# Altium PCB PCB2.pcbdoc (part 3 of 3)
Units mil, origin at the board's own origin, x right, y up, seen from the top; angles counter-clockwise.
Board outline 1771.65 x 2755.61 mil, 4 copper layers (Top Layer, Inner1, Inner2, Bottom Layer), stack 62.447 mil thick; 80 components, 88 nets, 409 pads, 183 vias.
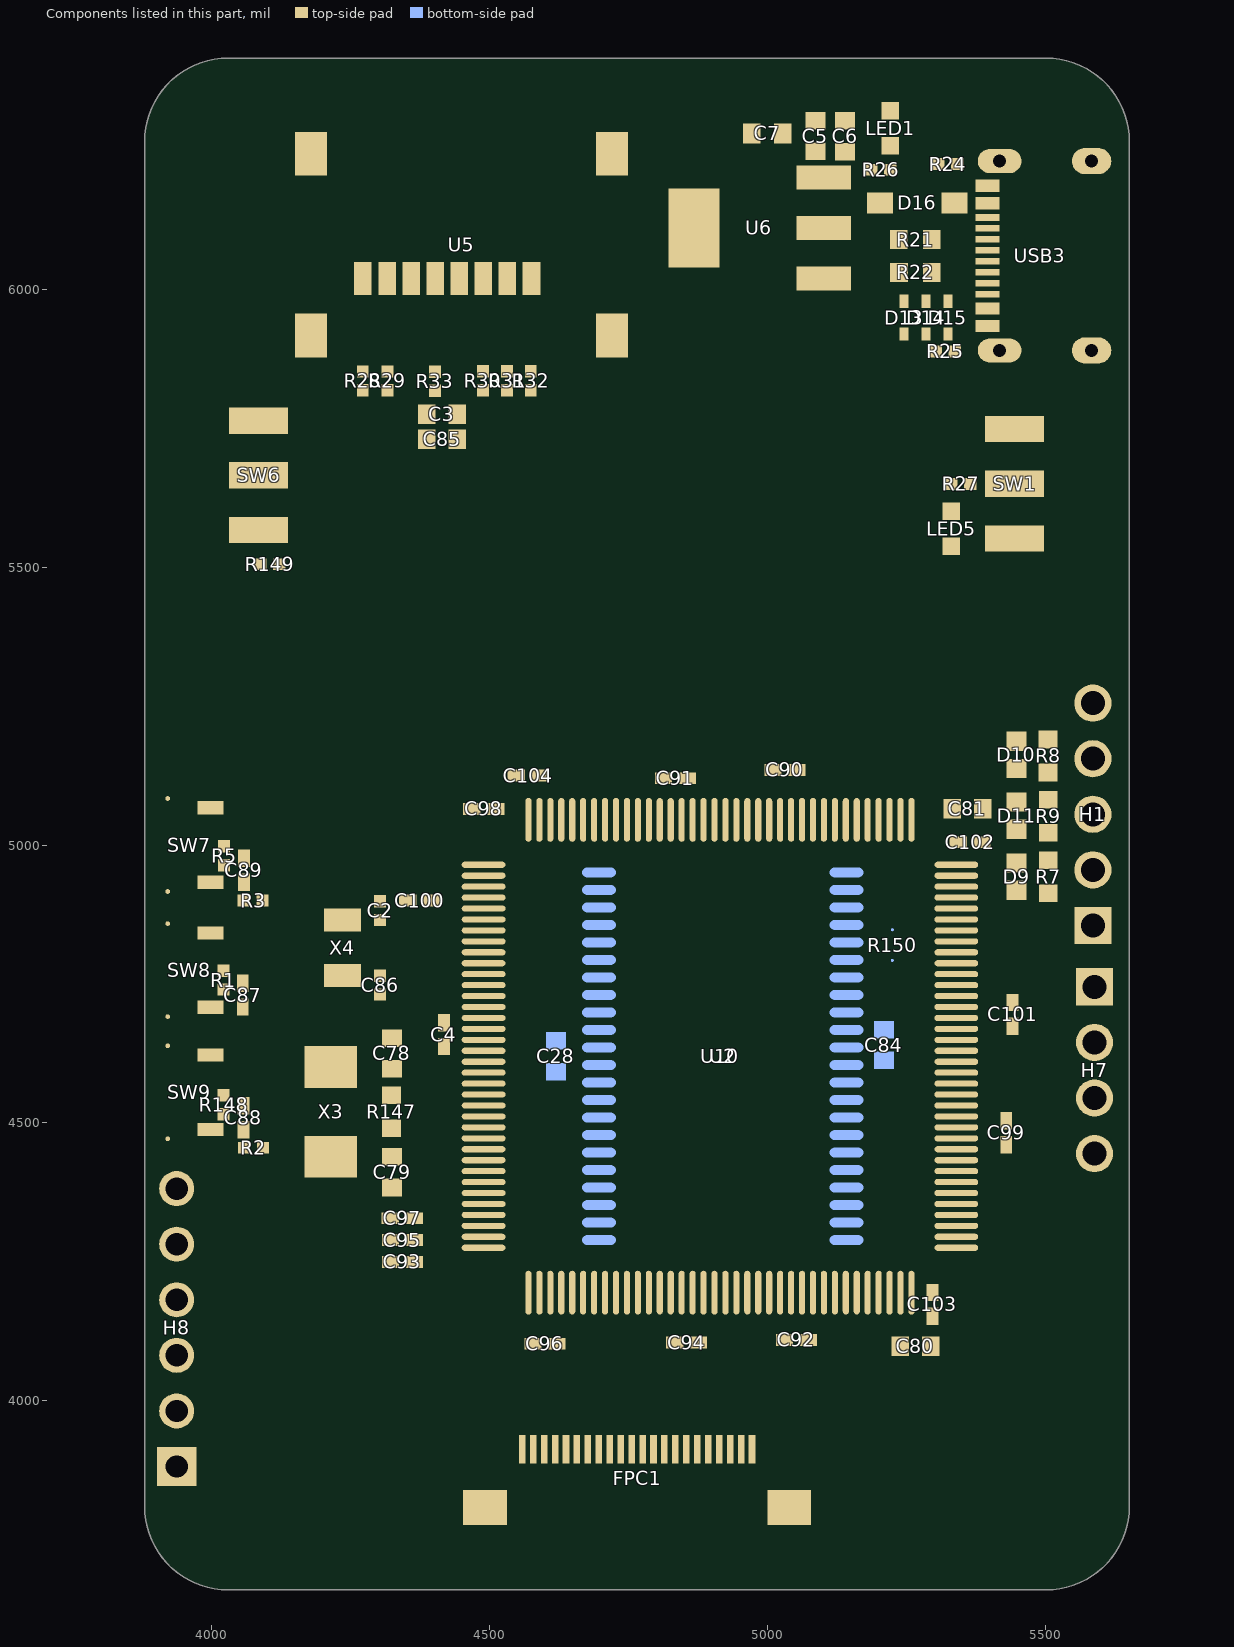
[diagram p5: the components of this part, seen from the top]

## Via types
v1: diameter 24.02, hole 12.01, Top Layer to Bottom Layer, 179 vias
v2: diameter 90.55, hole 82.68, Top Layer to Bottom Layer, 4 vias

## Nets (pads, with @x,y where several pads share a name; then routed paths per layer and width w, separated by ;. In a path a pad name is that pad's centre, name@x,y a point inside that pad or via, vN(x,y) a via of type N, cw(c..) or ccw(c..) an arc to the next point about the centre after c; other vN are vias at no path point) (continued)
pads on no net: H8.1 H8.2 U10.1 U10.2 U10.3 U10.4 U10.5 U10.7 U10.18 U10.19 U10.20 U10.21 U10.22 U10.26 U10.27 U10.28 U10.29 U10.44 U10.45 U10.46 U10.47 U10.48 U10.49 U10.69 U10.70 U10.73 U10.74 U10.75 U10.76 U10.91 U10.92 U10.93 U10.96 U10.97 U10.110 U10.117 U10.122 U10.124 U10.125 U10.126 U10.127 U10.128 U10.129 U10.132 U10.133 U10.134 U10.135 U10.136 U10.137 U10.139 U10.140 USB3.3 USB3.9

## Polygon pours and split planes (outlines as drawn)
NRST on Top Layer (solid, remove dead copper, pour order 6): 4045,4725 4035,4735 4035,4755 4015,4755 3980,4720 3970,4720 3970,4695 4040,4695 4045,4690 4065,4690 4070,4695 4070,4725
$1N25234 on Top Layer (solid, remove dead copper, pour order 8): 4035,4530 4035,4515 4045,4505 4070,4505 4070,4445 4046.71,4445 4016.71,4475 3975,4475 3970,4480 3970,4500 4005,4500 4010,4505 4010,4530
$1N25235 on Top Layer (solid, remove dead copper, pour order 10): 4045.97,4889.03 4015,4920 3975,4920 3970,4925 3970,4940 3975,4945 4005,4945 4010,4950 4010,4975 4035,4975 4035,4960 4045,4950 4070,4950 4070,4889.03
$1N4774 on Top Layer (solid, remove dead copper, pour order 12): 5545,5535 5535,5525 5395,5525 5390,5530 5390,5575 5395,5580 5535,5580 5545,5570
3.3V on Top Layer (solid, remove dead copper, pour order 14): 5300,4990 5300,4960 5305,4955 5375,4955 5385,4965 5385,4970.28 5360.28,4995 5360,4995 5360,5020.14 5330.14,5020.14
$1N4201 on Top Layer (solid, pour order 0): 5328.92,5954.53 5317.05,5966.4 5317.05,5990.07 5317.06,5990.07 5361.11,5990.07 5374.75,5976.43 5427.54,5976.43 5430.42,5973.54 5430.42,5965.98 5418.98,5954.53
5V_USB on Top Layer (solid, pour order 2): 5136.9,6178.59 5052.49,6178.59 5052.49,6252.34 5067.49,6267.35 5158.67,6267.35 5227.04,6198.98 5227.04,6136.5 5226.8,6136.26 5179.23,6136.26
$1N4593 on Top Layer (solid, pour order 4): 4990,6300 4990,6195 5050,6135 5150,6135 5155,6130 5155,6090 5150,6085 4965,6085 4915,6035 4825,6035 4820,6040 4820,6180 4825,6185 4880,6185 4955,6260 4955,6300
3.3V on Top Layer (solid, remove dead copper, pour order 16): 5285,4235 5255,4235 5253.19,4233.19 5253.19,4158.99 5257.15,4155.04 5262.48,4155.04 5285.73,4178.29 5310.09,4178.29 5310.11,4178.31 5310.11,4209.89
3.3V on Top Layer (solid, remove dead copper, pour order 18): 4530,4360 4530,4332.35 4526.42,4328.78 4399.28,4328.78 4382.24,4311.73 4382.24,4238.13 4350.18,4238.13 4348.8,4239.51 4348.8,4340.25 4368.49,4359.94 4482.22,4359.94 4482.28,4360
3.3V on Top Layer (solid, remove dead copper, pour order 20): 4575,5005 4540,5005 4495,5050 4495,5080 4500,5085 4580,5085 4580,5010
5V_USB on Top Layer (solid, remove dead copper, pour order 22): 4825,3890 4830,3885 4980,3885 4985,3890 4985,3935 4980,3940 4830,3940 4825,3935
GND on Top Layer (solid, remove dead copper, pour order 24): 3710,6670 6060,6670 6060,3550 3710,3550
GND on Bottom Layer (solid, remove dead copper, pour order 26): 3595,6825 6195,6825 6195,3000 3595,3000
GND on Inner1 (solid, remove dead copper): 3345,6830 6970,6830 6970,3350 3345,3350
GND on Inner2 (solid, remove dead copper): 3000,6645 7185,6645 7185,3075 3000,3075
5V_USB on Inner2 (solid, remove dead copper): 5145,6240 5195,6240 5210,6225 5210,6180 5205,6175 5145,6175

## Keep-outs
Board Outline Layer:
  the board outline again, w10

## Other copper
Top Layer:
  drawing of 189 lines, arcs and shapes, not listed
Inner1:
  region net 3.3V: 5519.95,4703.19 5519.95,4726.81 ccw(c5519.95,4771.1) 5555.39,4744.53 5555.39,4711.44 ccw(c5555.39,4631.28)
  region net 3.3V: 5536.74,4756.55 5526.8,4799.9 ccw(c5617.53,4890.63) 5555.39,4778.37 5555.39,4725.09 ccw(c5484.59,4704.4)
  region net NRST: 4426.35,4493 4426.35,4487 4424.82,4486.87 4423.6,4486.48 4422.59,4485.89 4421.72,4485.12 4420.05,4483.2 4417.94,4480.99 4417.94,4499.01 4420.05,4496.8 4421.72,4494.88 4422.59,4494.11 4423.6,4493.52 4424.82,4493.13
  region net A2: 4990.3,4860.86 4984.3,4860.86 4984.16,4862.39 4983.78,4863.61 4983.19,4864.62 4982.42,4865.49 4980.5,4867.16 4978.29,4869.27 4996.31,4869.27 4994.1,4867.16 4992.18,4865.49 4991.41,4864.62 4990.82,4863.61 4990.43,4862.39
  region net A1: 4963.19,4834.15 4957.19,4834.15 4957.05,4835.68 4956.67,4836.9 4956.08,4837.91 4955.31,4838.78 4953.39,4840.45 4951.18,4842.56 4969.2,4842.56 4966.99,4840.45 4965.07,4838.78 4964.3,4837.91 4963.71,4836.9 4963.32,4835.68
  region net A0: 4611.35,4793 4611.35,4787 4609.82,4786.87 4608.6,4786.48 4607.59,4785.89 4606.72,4785.12 4605.05,4783.2 4602.94,4780.99 4602.94,4799.01 4605.05,4796.8 4606.72,4794.88 4607.59,4794.11 4608.6,4793.52 4609.82,4793.13
  region net IO7: 5086.8,4460.32 5082.56,4464.56 5083.54,4465.74 5084.14,4466.87 5084.43,4468 5084.51,4469.16 5084.32,4471.7 5084.26,4474.75 5096.99,4462.02 5093.94,4462.08 5091.4,4462.26 5090.24,4462.19 5089.11,4461.9 5087.98,4461.3
  region net IO7: 5077,4300.56 5083,4302.08 5083.14,4300.59 5083.54,4299.35 5084.17,4298.3 5084.97,4297.37 5087,4295.65 5089.32,4293.68 5071.37,4292.15 5072.42,4293.41 5073.44,4294.4 5075.24,4296 5075.96,4296.82 5076.52,4297.78 5076.87,4298.99
  region net NRST: 5458.65,4917 5458.65,4923 5460.18,4923.13 5461.4,4923.52 5462.41,4924.11 5463.28,4924.88 5464.95,4926.8 5467.06,4929.01 5467.06,4910.99 5464.95,4913.2 5463.28,4915.12 5462.41,4915.89 5461.4,4916.48 5460.18,4916.87
  region net 3.3V: 4640.16,4100.88 4623.45,4084.18 4613.13,4094.23 4630.11,4111.21
  region net 3.3V: 4835.59,4053.19 4835.59,4076.81 4850,4077.01 4850,4052.99
  region net 3.3V: 5424.41,4726.81 5424.41,4703.19 5410,4702.99 5410,4727.01
  region net 3.3V: 4376.46,4926.84 4393.16,4943.54 4403.49,4933.49 4386.51,4916.51
  region net 3.3V: 4114.41,4991.81 4114.41,4968.19 4100,4967.99 4100,4992.01
  region net 3.3V: 5338.22,4968.19 5338.22,4991.81 5352.63,4992.01 5352.63,4967.99
  region net 3.3V: 5367.04,4991.81 5367.04,4968.19 5352.63,4967.99 5352.63,4992.01
  region net 3.3V: 5226.84,4918.54 5243.54,4901.84 5233.49,4891.51 5216.51,4908.49
Inner2:
  region net 3.3V: 5542.86,4774.2 5559.56,4790.9 ccw(c5597.14,4841.01) 5597.14,4778.37 5555.39,4736.62 ccw(c5492.75,4736.62)
  region net A18: 4770.9,4448.05 4769.98,4442.05 4768.39,4441.93 4767.18,4441.59 4766.25,4441.07 4765.48,4440.39 4763.92,4438.68 4762.9,4437.72 4761.57,4436.72 4764.15,4454.55 4765.06,4453.34 4765.77,4452.16 4766.96,4450.08 4767.62,4449.25 4768.44,4448.61 4769.5,4448.2
  region net A18: 5378.22,4450.01 5379.28,4456.01 5380.83,4456.14 5382.05,4456.5 5383.03,4457.07 5383.86,4457.8 5385.48,4459.65 5386.46,4460.68 5387.69,4461.76 5386.62,4443.78 5384.61,4446.06 5382.9,4448.06 5381.99,4448.86 5380.95,4449.47 5379.72,4449.87
  region net CS: 4998.68,4985.56 4994.44,4981.32 4993.27,4982.31 4992.13,4982.9 4991,4983.2 4989.84,4983.27 4987.3,4983.08 4984.25,4983.02 4996.98,4995.75 4996.92,4992.7 4996.73,4990.16 4996.8,4989 4997.1,4987.87 4997.69,4986.73
  region net CS: 5213.65,4812.01 5213.65,4817.99 5215.18,4818.13 5216.4,4818.51 5217.41,4819.1 5218.28,4819.87 5219.95,4821.8 5222.06,4824.01 5222.06,4805.99 5219.95,4808.2 5218.28,4810.13 5217.41,4810.9 5216.4,4811.49 5215.18,4811.87
  region net 5V_USB: 5171.81,6175.59 5148.19,6175.59 5147.99,6190 5172.01,6190
  region net 5V_USB: 5009.41,3936.81 5009.41,3913.19 4995,3912.99 4995,3937.01
  region net 3.3V: 5526.81,5635.59 5503.19,5635.59 5502.99,5650 5527.01,5650
Bottom Layer:
  region net $1N4774: 5617.23,4894.99 5625.58,4886.64 ccw(c5650.64,4867.84) 5619.32,4867.84 5598.44,4888.72 ccw(c5598.44,4920.04)
  region net GND: 4646.72,4638.75 4646.72,4632.75 ccw(c4646.72,4589.1) 4637.72,4631.81 4637.72,4643.25 ccw(c4646.72,4650)
  region net 3.3V: 4605.86,4568.34 4593.93,4578.69 ccw(c4560.53,4603.74) 4602.28,4603.74 4630.91,4576.69 ccw(c4630.91,4534.93)
  region net 3.3V: 4646.72,4607.25 4646.72,4601.25 ccw(c4646.72,4590) 4637.72,4596.75 4637.72,4608.19 ccw(c4646.72,4650.9)
  region net 3.3V: 4593.93,4607.37 4607.04,4616.54 ccw(c4632.09,4649.95) 4632.09,4608.19 4602.28,4582.32 ccw(c4560.53,4582.32)
  region net GND: 5183.28,4601.25 5183.28,4607.25 ccw(c5183.28,4618.5) 5192.28,4611.75 5192.28,4596.75 ccw(c5183.28,4590)
  region net GND: 5233.19,4607.25 5233.19,4601.25 ccw(c5233.19,4595.67) 5227.72,4596.75 5227.72,4611.75 ccw(c5233.19,4612.83)
  region net 3.3V: 5196.32,4647.08 5186.06,4645.31 ccw(c5044.31,4787.05) 5192.28,4651.81 5204.31,4651.81 ccw(c5209.57,4633.83)
  region net 3.3V: 5263.15,4679.37 5263.15,4655.75 ccw(c5263.15,4494.33) 5227.72,4651.81 5227.72,4683.31 ccw(c5263.15,4840.79)
  region net 3.3V: 3963.29,4420 3976.76,4400.06 3974.62,4397.58 3972.99,4394.99 3971.76,4392.28 3970.86,4389.45 3970.2,4386.5 3969.67,4383.43 3968.71,4376.92 3938.7,4413.41 3942,4413.35 3945.35,4413.45 3948.68,4413.74 3951.95,4414.28 3955.1,4415.13 3958.08,4416.33 3960.83,4417.93
  region net A4: 5107.31,4947.71 5107.31,4953.71 5108.77,4953.81 5110.01,4954.1 5111.08,4954.54 5112.05,4955.12 5113.97,4956.56 5116.31,4958.21 5116.31,4943.21 5113.97,4944.86 5112.05,4946.3 5111.08,4946.88 5110.01,4947.32 5108.77,4947.61
  region net A3: 5108.25,4916.21 5108.25,4922.21 5109.68,4922.31 5110.8,4922.6 5111.72,4923.04 5112.52,4923.62 5114.12,4925.06 5116.31,4926.71 5116.31,4911.71 5114.12,4913.36 5112.52,4914.8 5111.72,4915.38 5110.8,4915.82 5109.68,4916.11
  region net A1: 5107.31,4853.22 5107.31,4859.22 5108.77,4859.32 5110.01,4859.61 5111.08,4860.05 5112.05,4860.63 5113.97,4862.07 5116.31,4863.72 5116.31,4848.72 5113.97,4850.37 5112.05,4851.81 5111.08,4852.39 5110.01,4852.83 5108.77,4853.12
  region net A0: 5107.31,4821.72 5107.31,4827.72 5108.77,4827.82 5110.01,4828.11 5111.08,4828.55 5112.05,4829.13 5113.97,4830.57 5116.31,4832.22 5116.31,4817.22 5113.97,4818.87 5112.05,4820.31 5111.08,4820.89 5110.01,4821.33 5108.77,4821.62
  region net CS: 5178.01,4796.23 5178.01,4790.23 5176.55,4790.13 5175.31,4789.84 5174.24,4789.4 5173.27,4788.82 5171.35,4787.38 5169.01,4785.73 5169.01,4800.73 5171.35,4799.08 5173.27,4797.64 5174.24,4797.06 5175.31,4796.62 5176.55,4796.33
  region net IO0: 5178.01,4764.73 5178.01,4758.73 5176.55,4758.63 5175.31,4758.34 5174.24,4757.9 5173.27,4757.32 5171.35,4755.88 5169.01,4754.23 5169.01,4769.23 5171.35,4767.58 5173.27,4766.14 5174.24,4765.56 5175.31,4765.12 5176.55,4764.83
  region net IO1: 5178.01,4733.24 5178.01,4727.24 5176.55,4727.14 5175.31,4726.85 5174.24,4726.41 5173.27,4725.83 5171.35,4724.39 5169.01,4722.74 5169.01,4737.74 5171.35,4736.09 5173.27,4734.65 5174.24,4734.07 5175.31,4733.63 5176.55,4733.34
  region net IO2: 5178.01,4701.74 5178.01,4695.74 5176.55,4695.64 5175.31,4695.35 5174.24,4694.91 5173.27,4694.33 5171.35,4692.89 5169.01,4691.24 5169.01,4706.24 5171.35,4704.59 5173.27,4703.15 5174.24,4702.57 5175.31,4702.13 5176.55,4701.84
  region net IO3: 5107.31,4664.24 5107.31,4670.24 5108.77,4670.34 5110.01,4670.63 5111.08,4671.07 5112.05,4671.65 5113.97,4673.09 5116.31,4674.74 5116.31,4659.74 5113.97,4661.39 5112.05,4662.83 5111.08,4663.41 5110.01,4663.85 5108.77,4664.14
  region net 3.3V: 5178.01,4638.75 5178.01,4632.75 5176.55,4632.65 5175.31,4632.36 5174.24,4631.92 5173.27,4631.34 5171.35,4629.9 5169.01,4628.25 5169.01,4643.25 5171.35,4641.6 5173.27,4640.16 5174.24,4639.58 5175.31,4639.14 5176.55,4638.85
  region net GND: 5178.01,4607.25 5178.01,4601.25 5176.55,4601.15 5175.31,4600.86 5174.24,4600.42 5173.27,4599.84 5171.35,4598.4 5169.01,4596.75 5169.01,4611.75 5171.35,4610.1 5173.27,4608.66 5174.24,4608.08 5175.31,4607.64 5176.55,4607.35
  region net IO4: 5108.39,4568.54 5106.31,4574.54 5107.7,4574.65 5108.95,4574.97 5110.09,4575.46 5111.15,4576.1 5113.19,4577.7 5115.31,4579.54 5117.39,4564.69 5115.95,4565.41 5114.82,4566.1 5113.05,4567.33 5112.19,4567.83 5111.2,4568.21 5109.97,4568.45
  region net IO5: 5107.31,4538.26 5107.31,4544.26 5108.77,4544.36 5110.01,4544.65 5111.08,4545.09 5112.05,4545.67 5113.97,4547.11 5116.31,4548.76 5116.31,4533.76 5113.97,4535.41 5112.05,4536.85 5111.08,4537.43 5110.01,4537.87 5108.77,4538.16
  region net IO6: 5107.31,4506.76 5107.31,4512.76 5108.77,4512.86 5110.01,4513.15 5111.08,4513.59 5112.05,4514.17 5113.97,4515.61 5116.31,4517.26 5116.31,4502.26 5113.97,4503.91 5112.05,4505.35 5111.08,4505.93 5110.01,4506.37 5108.77,4506.66
  region net IO7: 5105.93,4477 5108.87,4483 5109.89,4483.12 5111.01,4483.43 5113.43,4484.44 5115.82,4485.61 5117.87,4486.53 5114.93,4471.83 5112.89,4473.73 5110.81,4475.38 5109.71,4476.05 5108.54,4476.56 5107.29,4476.88
  region net WE: 5107.31,4443.77 5107.31,4449.77 5108.77,4449.87 5110.01,4450.16 5111.08,4450.6 5112.05,4451.18 5113.97,4452.62 5116.31,4454.27 5116.31,4439.27 5113.97,4440.92 5112.05,4442.36 5111.08,4442.94 5110.01,4443.38 5108.77,4443.67
  region net A16: 5178.01,4418.28 5178.01,4412.28 5176.55,4412.18 5175.31,4411.89 5174.24,4411.45 5173.27,4410.87 5171.35,4409.43 5169.01,4407.78 5169.01,4422.78 5171.35,4421.13 5173.27,4419.69 5174.24,4419.11 5175.31,4418.67 5176.55,4418.38
  region net A15: 5173.7,4386.78 5173.7,4380.78 5172.96,4380.63 5172.32,4380.24 5171.23,4378.95 5170.21,4377.46 5169.65,4376.8 5169.01,4376.28 5169.01,4391.28 5169.65,4390.76 5170.21,4390.1 5171.23,4388.61 5172.32,4387.32 5172.96,4386.93
  region net A5: 4732.69,4953.71 4732.69,4947.71 4731.23,4947.61 4729.99,4947.32 4728.92,4946.88 4727.95,4946.3 4726.03,4944.86 4723.69,4943.21 4723.69,4958.21 4726.03,4956.56 4727.95,4955.12 4728.92,4954.54 4729.99,4954.1 4731.23,4953.81
  region net A7: 4729.52,4890.72 4729.52,4884.72 4728.73,4884.57 4727.97,4884.18 4726.49,4882.89 4725.07,4881.4 4723.69,4880.22 4723.69,4895.22 4725.07,4894.04 4726.49,4892.55 4727.97,4891.26 4728.73,4890.87
  region net UB: 4661.99,4821.72 4661.99,4827.72 4663.45,4827.82 4664.69,4828.11 4665.76,4828.55 4666.73,4829.13 4668.65,4830.57 4670.99,4832.22 4670.99,4817.22 4668.65,4818.87 4666.73,4820.31 4665.76,4820.89 4664.69,4821.33 4663.45,4821.62
  region net LB: 4661.99,4790.23 4661.99,4796.23 4663.45,4796.33 4664.69,4796.62 4665.76,4797.06 4666.73,4797.64 4668.65,4799.08 4670.99,4800.73 4670.99,4785.73 4668.65,4787.38 4666.73,4788.82 4665.76,4789.4 4664.69,4789.84 4663.45,4790.13
  region net IO15: 4732.69,4764.73 4732.69,4758.73 4731.23,4758.63 4729.99,4758.34 4728.92,4757.9 4727.95,4757.32 4726.03,4755.88 4723.69,4754.23 4723.69,4769.23 4726.03,4767.58 4727.95,4766.14 4728.92,4765.56 4729.99,4765.12 4731.23,4764.83
  region net IO14: 4732.69,4733.24 4732.69,4727.24 4731.23,4727.14 4729.99,4726.85 4728.92,4726.41 4727.95,4725.83 4726.03,4724.39 4723.69,4722.74 4723.69,4737.74 4726.03,4736.09 4727.95,4734.65 4728.92,4734.07 4729.99,4733.63 4731.23,4733.34
  region net IO13: 4732.69,4701.74 4732.69,4695.74 4731.23,4695.64 4729.99,4695.35 4728.92,4694.91 4727.95,4694.33 4726.03,4692.89 4723.69,4691.24 4723.69,4706.24 4726.03,4704.59 4727.95,4703.15 4728.92,4702.57 4729.99,4702.13 4731.23,4701.84
  region net IO12: 4732.69,4670.24 4732.69,4664.24 4731.23,4664.14 4729.99,4663.85 4728.92,4663.41 4727.95,4662.83 4726.03,4661.39 4723.69,4659.74 4723.69,4674.74 4726.03,4673.09 4727.95,4671.65 4728.92,4671.07 4729.99,4670.63 4731.23,4670.34
  region net GND: 4661.99,4632.75 4661.99,4638.75 4663.45,4638.85 4664.69,4639.14 4665.76,4639.58 4666.73,4640.16 4668.65,4641.6 4670.99,4643.25 4670.99,4628.25 4668.65,4629.9 4666.73,4631.34 4665.76,4631.92 4664.69,4632.36 4663.45,4632.65
  region net 3.3V: 4661.99,4601.25 4661.99,4607.25 4663.45,4607.35 4664.69,4607.64 4665.76,4608.08 4666.73,4608.66 4668.65,4610.1 4670.99,4611.75 4670.99,4596.75 4668.65,4598.4 4666.73,4599.84 4665.76,4600.42 4664.69,4600.86 4663.45,4601.15
  region net IO11: 4732.69,4575.76 4732.69,4569.76 4731.23,4569.66 4729.99,4569.37 4728.92,4568.93 4727.95,4568.35 4726.03,4566.91 4723.69,4565.26 4723.69,4580.26 4726.03,4578.61 4727.95,4577.17 4728.92,4576.59 4729.99,4576.15 4731.23,4575.86
  region net IO10: 4732.69,4544.26 4732.69,4538.26 4731.23,4538.16 4729.99,4537.87 4728.92,4537.43 4727.95,4536.85 4726.03,4535.41 4723.69,4533.76 4723.69,4548.76 4726.03,4547.11 4727.95,4545.67 4728.92,4545.09 4729.99,4544.65 4731.23,4544.36
  region net IO9: 4732.69,4512.76 4732.69,4506.76 4731.23,4506.66 4729.99,4506.37 4728.92,4505.93 4727.95,4505.35 4726.03,4503.91 4723.69,4502.26 4723.69,4517.26 4726.03,4515.61 4727.95,4514.17 4728.92,4513.59 4729.99,4513.15 4731.23,4512.86
  region net IO8: 4733.55,4480.22 4731.77,4474.22 4730.21,4474.13 4728.98,4473.88 4727.98,4473.49 4727.1,4472.99 4725.31,4471.72 4722.77,4470.27 4724.55,4485.17 4726.71,4483.35 4728.73,4481.77 4729.78,4481.13 4730.91,4480.65 4732.15,4480.33
  region net A18: 4732.69,4449.77 4732.69,4443.77 4731.23,4443.67 4729.99,4443.38 4728.92,4442.94 4727.95,4442.36 4726.03,4440.92 4723.69,4439.27 4723.69,4454.27 4726.03,4452.62 4727.95,4451.18 4728.92,4450.6 4729.99,4450.16 4731.23,4449.87
  region net A8: 4732.69,4418.28 4732.69,4412.28 4731.23,4412.18 4729.99,4411.89 4728.92,4411.45 4727.95,4410.87 4726.03,4409.43 4723.69,4407.78 4723.69,4422.78 4726.03,4421.13 4727.95,4419.69 4728.92,4419.11 4729.99,4418.67 4731.23,4418.38
  region net A11: 4729.9,4324.6 4729.9,4318.6 4729.15,4318.45 4728.41,4318.02 4726.98,4316.63 4725.62,4315.02 4724.36,4313.75 4722.98,4328.69 4724.6,4327.62 4726.35,4326.26 4728.14,4325.1 4729.03,4324.74
  region net A17: 4732.8,4292.16 4732.58,4286.16 4731.1,4286.06 4729.87,4285.78 4728.81,4285.34 4727.85,4284.77 4725.94,4283.35 4723.58,4281.72 4723.8,4296.72 4726.12,4295.04 4728.05,4293.58 4729.04,4293 4730.11,4292.55 4731.35,4292.26
  region net 3.3V: 5213.19,4896.6 5236.81,4896.6 ccw(c6236.71,4896.6) 5237.44,4861.17 5236.81,4861.28 5213.19,4861.28 5212.57,4861.17 ccw(c4205.26,4896.6)
  region net CS: 5199.07,4790.23 5199.07,4796.23 ccw(c5199.07,4808.19) 5208.07,4800.32 5208.07,4796.23 5208.07,4790.23 5208.07,4785.73 ccw(c5199.07,4778.98)
  region net CS: 5222.01,4810 5227.99,4810 ccw(c5232.48,4810.78) 5232.48,4806.22 5227.99,4806.22 5222.01,4806.22 5217.52,4806.22 ccw(c5217.52,4810.78)
  region net $1N4774: 5546.35,5560.91 5546.35,5549.09 5544.26,5548.84 5541.92,5548.15 5539.69,5547.16 5537.94,5545.99 5537.94,5564.01 5539.69,5562.84 5541.92,5561.85 5544.26,5561.16
  region net DAISY: 4714.39,4148.65 4720.39,4148.65 4720.52,4147.12 4720.9,4145.9 4721.5,4144.89 4722.26,4144.02 4724.19,4142.35 4726.39,4140.24 4708.38,4140.24 4710.59,4142.35 4712.51,4144.02 4713.28,4144.89 4713.87,4145.9 4714.25,4147.12
  region net DAISY: 4558.68,4285.56 4554.44,4281.32 4553.26,4282.3 4552.13,4282.9 4551,4283.19 4549.84,4283.26 4547.3,4283.08 4544.25,4283.02 4556.98,4295.75 4556.92,4292.7 4556.74,4290.16 4556.81,4289 4557.1,4287.87 4557.7,4286.74
  region net USB_OTG_FS_DM: 5432.07,4864.08 5432.07,4858.08 5430.54,4857.94 5429.32,4857.56 5428.31,4856.97 5427.44,4856.2 5425.77,4854.27 5423.66,4852.07 5423.66,4870.08 5425.77,4867.88 5427.44,4865.95 5428.31,4865.18 5429.32,4864.59 5430.54,4864.21
  region net USB_OTG_FS_DP: 5432.19,4894.18 5432.19,4888.18 5430.67,4888.04 5429.44,4887.66 5428.44,4887.07 5427.56,4886.3 5425.9,4884.38 5423.79,4882.17 5423.79,4900.18 5425.9,4897.98 5427.56,4896.05 5428.44,4895.29 5429.44,4894.69 5430.67,4894.31
  region net USB_OTG_FS_DM: 5339.68,5812.07 5333.68,5800.42 5333.57,5801.87 5333.25,5803.29 5332.74,5804.65 5332.03,5805.89 5331.15,5806.98 5330.09,5807.86 5328.88,5808.49 5327.53,5808.83 5340.95,5820.48 5340.71,5817.97 5340.28,5816.27 5339.87,5814.58
  region net RST(ADS8688): 4813.14,3978 4813.14,3972 4811.61,3971.87 4810.39,3971.48 4809.38,3970.89 4808.51,3970.12 4806.84,3968.2 4804.73,3965.99 4804.73,3984.01 4806.84,3981.8 4808.51,3979.88 4809.38,3979.11 4810.39,3978.52 4811.61,3978.13
  region net RST(ADS8688): 5423.68,4785.56 5419.44,4781.32 5418.26,4782.3 5417.13,4782.9 5416,4783.19 5414.84,4783.26 5412.3,4783.08 5409.25,4783.02 5421.98,4795.75 5421.92,4792.7 5421.74,4790.16 5421.81,4789 5422.1,4787.87 5422.7,4786.74
  region net WKUP: 4408.65,4302 4408.65,4308 4410.18,4308.13 4411.4,4308.52 4412.41,4309.11 4413.28,4309.88 4414.95,4311.8 4417.06,4314.01 4417.06,4295.99 4414.95,4298.2 4413.28,4300.12 4412.41,4300.89 4411.4,4301.48 4410.18,4301.87
  region net WKUP: 4096.02,4417.41 4090.02,4417.41 4089.89,4418.94 4089.5,4420.16 4088.91,4421.17 4088.14,4422.04 4086.22,4423.71 4084.01,4425.82 4102.03,4425.82 4099.82,4423.71 4097.9,4422.04 4097.13,4421.17 4096.54,4420.16 4096.16,4418.94
  region net NRST: 4095.31,4695.56 4091.07,4691.32 4089.89,4692.3 4088.76,4692.9 4087.63,4693.19 4086.47,4693.26 4083.93,4693.08 4080.88,4693.02 4093.61,4705.75 4093.55,4702.7 4093.36,4700.16 4093.44,4699 4093.73,4697.87 4094.33,4696.74
  region net NRST: 4396.32,4499.44 4400.56,4503.68 4401.74,4502.7 4402.87,4502.1 4404,4501.81 4405.16,4501.74 4407.7,4501.92 4410.75,4501.98 4398.02,4489.25 4398.08,4492.3 4398.26,4494.84 4398.19,4496 4397.9,4497.13 4397.3,4498.26
  region net UB: 4639.4,4967.51 4633.4,4967.51 4633.26,4968.9 4632.86,4969.91 4632.23,4970.64 4631.41,4971.19 4629.36,4972.21 4628.21,4972.89 4627.02,4973.82 4644.93,4975.72 4643.9,4974.45 4642.9,4973.47 4641.13,4971.95 4640.42,4971.18 4639.88,4970.26 4639.53,4969.07
  region net A5: 4783.08,4947.71 4783.57,4953.71 4785.1,4953.84 4786.32,4954.22 4787.32,4954.8 4788.17,4955.55 4789.81,4957.43 4790.78,4958.49 4791.97,4959.59 4791.44,4941.59 4789.38,4943.84 4787.71,4945.8 4786.83,4946.58 4785.82,4947.18 4784.59,4947.57
  region net A6: 4808.65,4916.21 4808.65,4922.21 4810.18,4922.34 4811.4,4922.73 4812.41,4923.32 4813.28,4924.09 4814.95,4926.01 4817.06,4928.22 4817.06,4910.2 4814.95,4912.41 4813.28,4914.33 4812.41,4915.1 4811.4,4915.69 4810.18,4916.08
  region net IO13: 4973.88,4692.66 4978.12,4696.91 4979.3,4695.92 4980.43,4695.33 4981.56,4695.03 4982.72,4694.96 4985.26,4695.14 4988.31,4695.21 4975.58,4682.47 4975.65,4685.53 4975.83,4688.06 4975.75,4689.22 4975.46,4690.35 4974.86,4691.49
  region net IO12: 5025.2,4490.56 5028.13,4496.11 5029.29,4495.16 5030.45,4494.57 5031.65,4494.26 5032.88,4494.18 5035.56,4494.39 5038.59,4494.67 5027.22,4480.7 5027.05,4482.33 5027.05,4483.75 5027.18,4486.13 5027.11,4487.2 5026.83,4488.26 5026.22,4489.36
  region net IO11: 5025.39,4438.08 5029.63,4442.32 5030.8,4441.34 5031.94,4440.74 5033.07,4440.45 5034.23,4440.38 5036.77,4440.56 5039.82,4440.63 5027.08,4427.89 5027.15,4430.94 5027.33,4433.48 5027.26,4434.64 5026.97,4435.77 5026.37,4436.91
  region net IO8: 5023.38,4329.07 5022.47,4335.07 5023.98,4335.21 5025.21,4335.6 5026.24,4336.22 5027.15,4337.01 5028.85,4338.99 5030.88,4341.27 5031.78,4323.28 5030.57,4324.36 5029.59,4325.41 5027.96,4327.26 5027.12,4328 5026.14,4328.57 5024.92,4328.94
  region net A9: 4911.06,4380.78 4911.28,4386.78 4912.81,4386.91 4914.04,4387.29 4915.04,4387.88 4915.9,4388.64 4917.56,4390.55 4918.52,4391.62 4919.69,4392.73 4919.47,4374.72 4917.38,4376.95 4915.7,4378.89 4914.82,4379.66 4913.81,4380.26 4912.58,4380.64
  region net A11: 4956.32,4307.08 4951.88,4311.12 4952.85,4312.29 4953.45,4313.43 4953.74,4314.57 4953.82,4315.74 4953.63,4318.3 4953.53,4321.35 4966.46,4308.82 4964.85,4308.77 4963.41,4308.85 4960.89,4309.03 4959.75,4308.95 4958.63,4308.66 4957.5,4308.06
  region net A3: 4769.8,4817.4 4769.8,4811.4 4769.01,4811.2 4768.33,4810.67 4767.73,4809.89 4767.19,4808.96 4766.15,4806.96 4765.6,4806.08 4765,4805.39 4765,4823.4 4765.6,4822.71 4766.15,4821.83 4767.19,4819.84 4767.73,4818.9 4768.33,4818.12 4769.01,4817.59
  region net A0: 4950.15,4827.72 4955.55,4821.72 4954.13,4821.57 4952.85,4821.13 4951.68,4820.46 4950.62,4819.59 4948.76,4817.41 4947.14,4814.91 4941.74,4832.09 4943.71,4830.95 4945.86,4829.5 4948.04,4828.25 4949.11,4827.86
  region net IO0: 5187.44,4758.73 5190.03,4764.73 5191.63,4764.85 5192.83,4765.19 5193.76,4765.71 5194.53,4766.39 5196.09,4768.1 5197.1,4769.06 5198.44,4770.06 5195.84,4752.23 5193.97,4754.62 5192.2,4756.7 5191.24,4757.53 5190.16,4758.17 5188.91,4758.58
  region net IO1: 5209.64,4727 5209.64,4733 5211.17,4733.13 5212.39,4733.52 5213.4,4734.11 5214.27,4734.88 5215.94,4736.8 5218.05,4739.01 5218.05,4720.99 5215.94,4723.2 5214.27,4725.12 5213.4,4725.89 5212.39,4726.48 5211.17,4726.87
  region net IO2: 5163.65,4695.74 5163.65,4701.74 5165.18,4701.87 5166.4,4702.26 5167.41,4702.85 5168.28,4703.62 5169.95,4705.54 5172.06,4707.75 5172.06,4689.73 5169.95,4691.94 5168.28,4693.86 5167.41,4694.63 5166.4,4695.22 5165.18,4695.61
  region net IO3: 5111.35,4670.24 5111.35,4664.24 5109.82,4664.11 5108.6,4663.72 5107.59,4663.13 5106.72,4662.36 5105.05,4660.44 5102.94,4658.23 5102.94,4676.25 5105.05,4674.04 5106.72,4672.12 5107.59,4671.35 5108.6,4670.76 5109.82,4670.37
  region net IO4: 5110.12,4574.54 5110.12,4568.54 5108.6,4568.4 5107.37,4568.02 5106.37,4567.43 5105.5,4566.66 5103.83,4564.74 5101.72,4562.53 5101.72,4580.54 5103.83,4578.34 5105.5,4576.41 5106.37,4575.64 5107.37,4575.05 5108.6,4574.67
  region net IO5: 5110.36,4544.26 5112.25,4538.26 5110.76,4538.12 5109.52,4537.71 5108.46,4537.08 5107.52,4536.27 5105.78,4534.22 5103.84,4531.88 5101.95,4549.79 5103.24,4548.76 5104.24,4547.76 5105.83,4545.99 5106.63,4545.28 5107.58,4544.74 5108.79,4544.38
  region net IO6: 5111.35,4512.76 5111.35,4506.76 5109.82,4506.63 5108.6,4506.24 5107.59,4505.65 5106.72,4504.88 5105.05,4502.96 5102.94,4500.75 5102.94,4518.77 5105.05,4516.56 5106.72,4514.64 5107.59,4513.87 5108.6,4513.28 5109.82,4512.89
  region net WE: 5063,4723.65 5057,4723.65 5056.87,4725.18 5056.48,4726.4 5055.89,4727.41 5055.12,4728.28 5053.2,4729.95 5050.99,4732.06 5069.01,4732.06 5066.8,4729.95 5064.88,4728.28 5064.11,4727.41 5063.52,4726.4 5063.13,4725.18
  region net A16: 5166.67,4412.28 5165.72,4418.28 5167.23,4418.42 5168.46,4418.81 5169.5,4419.43 5170.4,4420.22 5172.1,4422.21 5174.13,4424.49 5175.08,4406.5 5173.86,4407.58 5172.88,4408.62 5171.25,4410.47 5170.41,4411.21 5169.43,4411.78 5168.22,4412.15
  region net A14: 5394.59,4601.32 5390.35,4605.56 5391.33,4606.74 5391.93,4607.87 5392.22,4609 5392.3,4610.16 5392.11,4612.7 5392.05,4615.75 5404.78,4603.02 5401.73,4603.08 5399.19,4603.26 5398.03,4603.19 5396.9,4602.9 5395.77,4602.3
  region net A12: 5412.66,4547 5412.66,4553 5414.18,4553.13 5415.41,4553.52 5416.42,4554.11 5417.29,4554.88 5418.95,4556.8 5421.07,4559.01 5421.07,4540.99 5418.95,4543.2 5417.29,4545.12 5416.42,4545.89 5415.41,4546.48 5414.18,4546.87
  region net A17: 5417.94,4398.61 5411.94,4398.69 5411.81,4400.22 5411.43,4401.45 5410.84,4402.45 5410.07,4403.32 5408.15,4404.98 5405.96,4407.1 5423.97,4407.02 5421.76,4404.91 5419.83,4403.24 5419.06,4402.37 5418.46,4401.36 5418.08,4400.13
  region net IO7: 5107.03,4483 5116.03,4477 5114.68,4476.85 5113.36,4476.41 5112.09,4475.74 5110.9,4474.86 5109.84,4473.83 5108.91,4472.68 5108.17,4471.44 5107.62,4470.17 5098.62,4485.77 5100.89,4485.04 5102.8,4484.13 5104.72,4483.34 5105.8,4483.09
  region net A18: 4738.65,4443.77 4738.65,4449.77 4740.18,4449.9 4741.4,4450.29 4742.41,4450.88 4743.28,4451.65 4744.95,4453.57 4747.06,4455.78 4747.06,4437.76 4744.95,4439.97 4743.28,4441.89 4742.41,4442.66 4741.4,4443.25 4740.18,4443.64
  region net SDIO_D1: 5256.92,4812.49 5262.92,4812.49 5263.06,4810.97 5263.44,4809.74 5264.03,4808.74 5264.8,4807.86 5266.72,4806.2 5268.93,4804.09 5250.92,4804.09 5253.12,4806.2 5255.05,4807.86 5255.82,4808.74 5256.41,4809.74 5256.79,4810.97
  region net SDIO_D0: 5281.02,4779.9 5287.02,4779.9 5287.16,4778.37 5287.54,4777.15 5288.13,4776.14 5288.9,4775.27 5290.82,4773.6 5293.03,4771.49 5275.02,4771.49 5277.22,4773.6 5279.14,4775.27 5279.91,4776.14 5280.51,4777.15 5280.89,4778.37
  region net SDIO_D1: 4286.15,5868.67 4281.9,5864.43 4280.73,5865.41 4279.59,5866.01 4278.46,5866.3 4277.3,5866.38 4274.77,5866.19 4271.71,5866.13 4284.45,5878.86 4284.38,5875.81 4284.2,5873.27 4284.27,5872.11 4284.57,5870.98 4285.16,5869.85
  region net SDIO_D0: 4329.82,5869.54 4325.58,5865.29 4324.4,5866.28 4323.27,5866.87 4322.14,5867.17 4320.98,5867.24 4318.44,5867.06 4315.39,5866.99 4328.12,5879.73 4328.06,5876.67 4327.88,5874.14 4327.95,5872.98 4328.24,5871.85 4328.84,5870.71
  region net SDIO_CLK: 4405.75,5862.63 4399.75,5862.63 4399.62,5864.15 4399.23,5865.38 4398.64,5866.38 4397.87,5867.26 4395.95,5868.92 4393.74,5871.03 4411.76,5871.03 4409.55,5868.92 4407.63,5867.26 4406.86,5866.38 4406.27,5865.38 4405.88,5864.15
  region net SDIO_CMD: 4492.37,5862.63 4486.37,5862.63 4486.24,5864.15 4485.85,5865.38 4485.26,5866.38 4484.49,5867.26 4482.57,5868.92 4480.36,5871.03 4498.38,5871.03 4496.17,5868.92 4494.25,5867.26 4493.48,5866.38 4492.89,5865.38 4492.5,5864.15
  region net SDIO_D3: 4535.15,5862.1 4529.15,5862.1 4529.02,5863.62 4528.64,5864.85 4528.04,5865.86 4527.28,5866.73 4525.35,5868.39 4523.15,5870.51 4541.16,5870.51 4538.95,5868.39 4537.03,5866.73 4536.26,5865.86 4535.67,5864.85 4535.29,5863.62
  region net SDIO_D2: 4577.63,5861.93 4571.63,5861.93 4571.49,5863.46 4571.11,5864.68 4570.52,5865.69 4569.75,5866.56 4567.83,5868.23 4565.62,5870.34 4583.63,5870.34 4581.43,5868.23 4579.5,5866.56 4578.73,5865.69 4578.14,5864.68 4577.76,5863.46
  region net SDIO_CLK: 5128.65,5157 5128.65,5163 5130.18,5163.13 5131.4,5163.52 5132.41,5164.11 5133.28,5164.88 5134.95,5166.8 5137.06,5169.01 5137.06,5150.99 5134.95,5153.2 5133.28,5155.12 5132.41,5155.89 5131.4,5156.48 5130.18,5156.87
  region net SDIO_D3: 5131.32,5209.44 5135.56,5213.68 5136.74,5212.7 5137.87,5212.1 5139,5211.81 5140.16,5211.74 5142.7,5211.92 5145.75,5211.98 5133.02,5199.25 5133.08,5202.3 5133.26,5204.84 5133.19,5206 5132.9,5207.13 5132.3,5208.26
  region net SDIO_CMD: 5106.32,5190.43 5110.56,5194.67 5111.74,5193.69 5112.87,5193.09 5114,5192.8 5115.16,5192.73 5117.7,5192.91 5120.75,5192.98 5108.02,5180.24 5108.08,5183.29 5108.26,5185.83 5108.19,5186.99 5107.9,5188.12 5107.3,5189.26
  region net SDIO_D2: 5152.53,5230.65 5156.77,5234.89 5157.95,5233.91 5159.08,5233.31 5160.22,5233.02 5161.37,5232.95 5163.91,5233.13 5166.97,5233.2 5154.23,5220.46 5154.3,5223.51 5154.48,5226.05 5154.4,5227.21 5154.11,5228.34 5153.52,5229.48
  region net 3.3V: 4431.81,4379.21 4408.19,4379.21 4407.99,4393.62 4432.01,4393.62
  region net 3.3V: 4425.99,4410.75 4437.13,4399.61 4435.29,4398 4433.7,4396.63 4433.05,4395.9 4432.53,4395.07 4432.17,4394.07 4431.98,4392.87 4419.25,4405.6 4420.45,4405.79 4421.45,4406.15 4422.28,4406.67 4423.01,4407.32 4424.38,4408.91
  region net 3.3V: 4592.49,4631.09 4587.17,4614.13 4586.21,4615.25 4585.43,4616.4 4584.09,4618.47 4583.41,4619.22 4582.62,4619.67 4581.66,4619.72 4580.46,4619.3 4585.44,4635.93 4586.14,4634.94 4586.93,4634.23 4588.69,4633.29 4590.58,4632.46 4591.54,4631.88
  region net 3.3V: 4556.46,4631.84 4573.16,4648.54 4583.49,4638.49 4566.51,4621.51
  region net CS: 5227.99,4795.62 5222.01,4803.12 5221.89,4804.24 5221.58,4805.31 5220.58,4807.37 5219.42,4809.42 5218.5,4811.53 5234.88,4804.03 5232.35,4802.6 5231.19,4801.69 5230.14,4800.67 5229.26,4799.54 5228.58,4798.31 5228.15,4797
  region net 3.3V: 4561.81,5050.59 4538.19,5050.59 4537.99,5065 4562.01,5065
  region net 3.3V: 4535.59,5053.19 4535.59,5076.81 4550,5077.01 4550,5052.99
  region net 3.3V: 4551.84,5083.54 4568.54,5066.84 4558.49,5056.51 4541.51,5073.49
  region net 3.3V: 4750.59,5113.19 4750.59,5136.81 4765,5137.01 4765,5112.99
  region net 3.3V: 5395.59,4703.19 5395.59,4726.81 5410,4727.01 5410,4702.99
  region net 3.3V: 4088.16,4511.46 4071.46,4528.16 4081.51,4538.49 4098.49,4521.51
  region net 3.3V: 4067.35,4528.55 4082.89,4546.42 4084.54,4544.83 4086.3,4543.43 4088.22,4542.43 4089.26,4542.13 4090.37,4542 4078.24,4527.55 4078,4528.3 4077.64,4528.8 4077.17,4529.09 4076.61,4529.21 4075.26,4529.03 4073.7,4528.54 4072.02,4527.98 4070.34,4527.63 4069.53,4527.61 4068.75,4527.73 4068.02,4528.03
  region net 3.3V: 4408.19,4359.41 4431.81,4359.41 4432.01,4345 4407.99,4345
  region net 3.3V: 4383.19,4939.41 4406.81,4939.41 4407.01,4925 4382.99,4925
  region net 3.3V: 4111.81,4965.59 4088.19,4965.59 4087.99,4980 4112.01,4980
  region net 3.3V: 5236.81,4885.59 5213.19,4885.59 5212.99,4900 5237.01,4900

## Silkscreen, mask and mechanical layers (free items; w line width, h text height)
Top Silkscreen Layer:
  text "内置可编程电压 / 检测器（PVD） / 关闭/开启" at 3895,6275 h59.06 r270
  text "墨藤" at 4675,5605 h118.11
  text "烧录/运行" at 5480,5240 h59.06 r90
  text "GND / CLK / DIO / RST / 3.3V" at 5275,5215 h39.37
  text "BOOT0 / NRST / KEY" at 3900,5170 h59.06
  text "3.3V / GND / U_RX / U_TX" at 5405,4070 h59.06
  text "<= / <= / <=" at 4060,4030 h39.37
Bottom Silkscreen Layer:
  lines w10: 3880,3809.98 3880,5335.33 cw(c4030,5335.33) 4030,5485.33 5501.65,5485.33 cw(c5501.65,5335.33) 5651.65,5335.33 5651.65,3809.98 cw(c5501.67,3809.98) 5501.65,3660 4030,3660 cw(c4029.98,3809.98) 3880,3809.98

## Dimensions
3880,3205 to 5650,3205 on Document Layer
6325,3660 to 6325,6415 on Document Layer